# Altium PCB stabilizer_current_sense.PcbDoc (part 2 of 3)
Units mm, origin at the board's own origin, x right, y up, seen from the top; angles counter-clockwise.
Board outline 113.55 x 100 mm, 4 copper layers (Top, L2, L3, Bottom Layer), stack 1.579 mm thick; 206 components, 77 nets, 530 pads, 258 vias.
Unrouted connection lines stored in the file: 53.
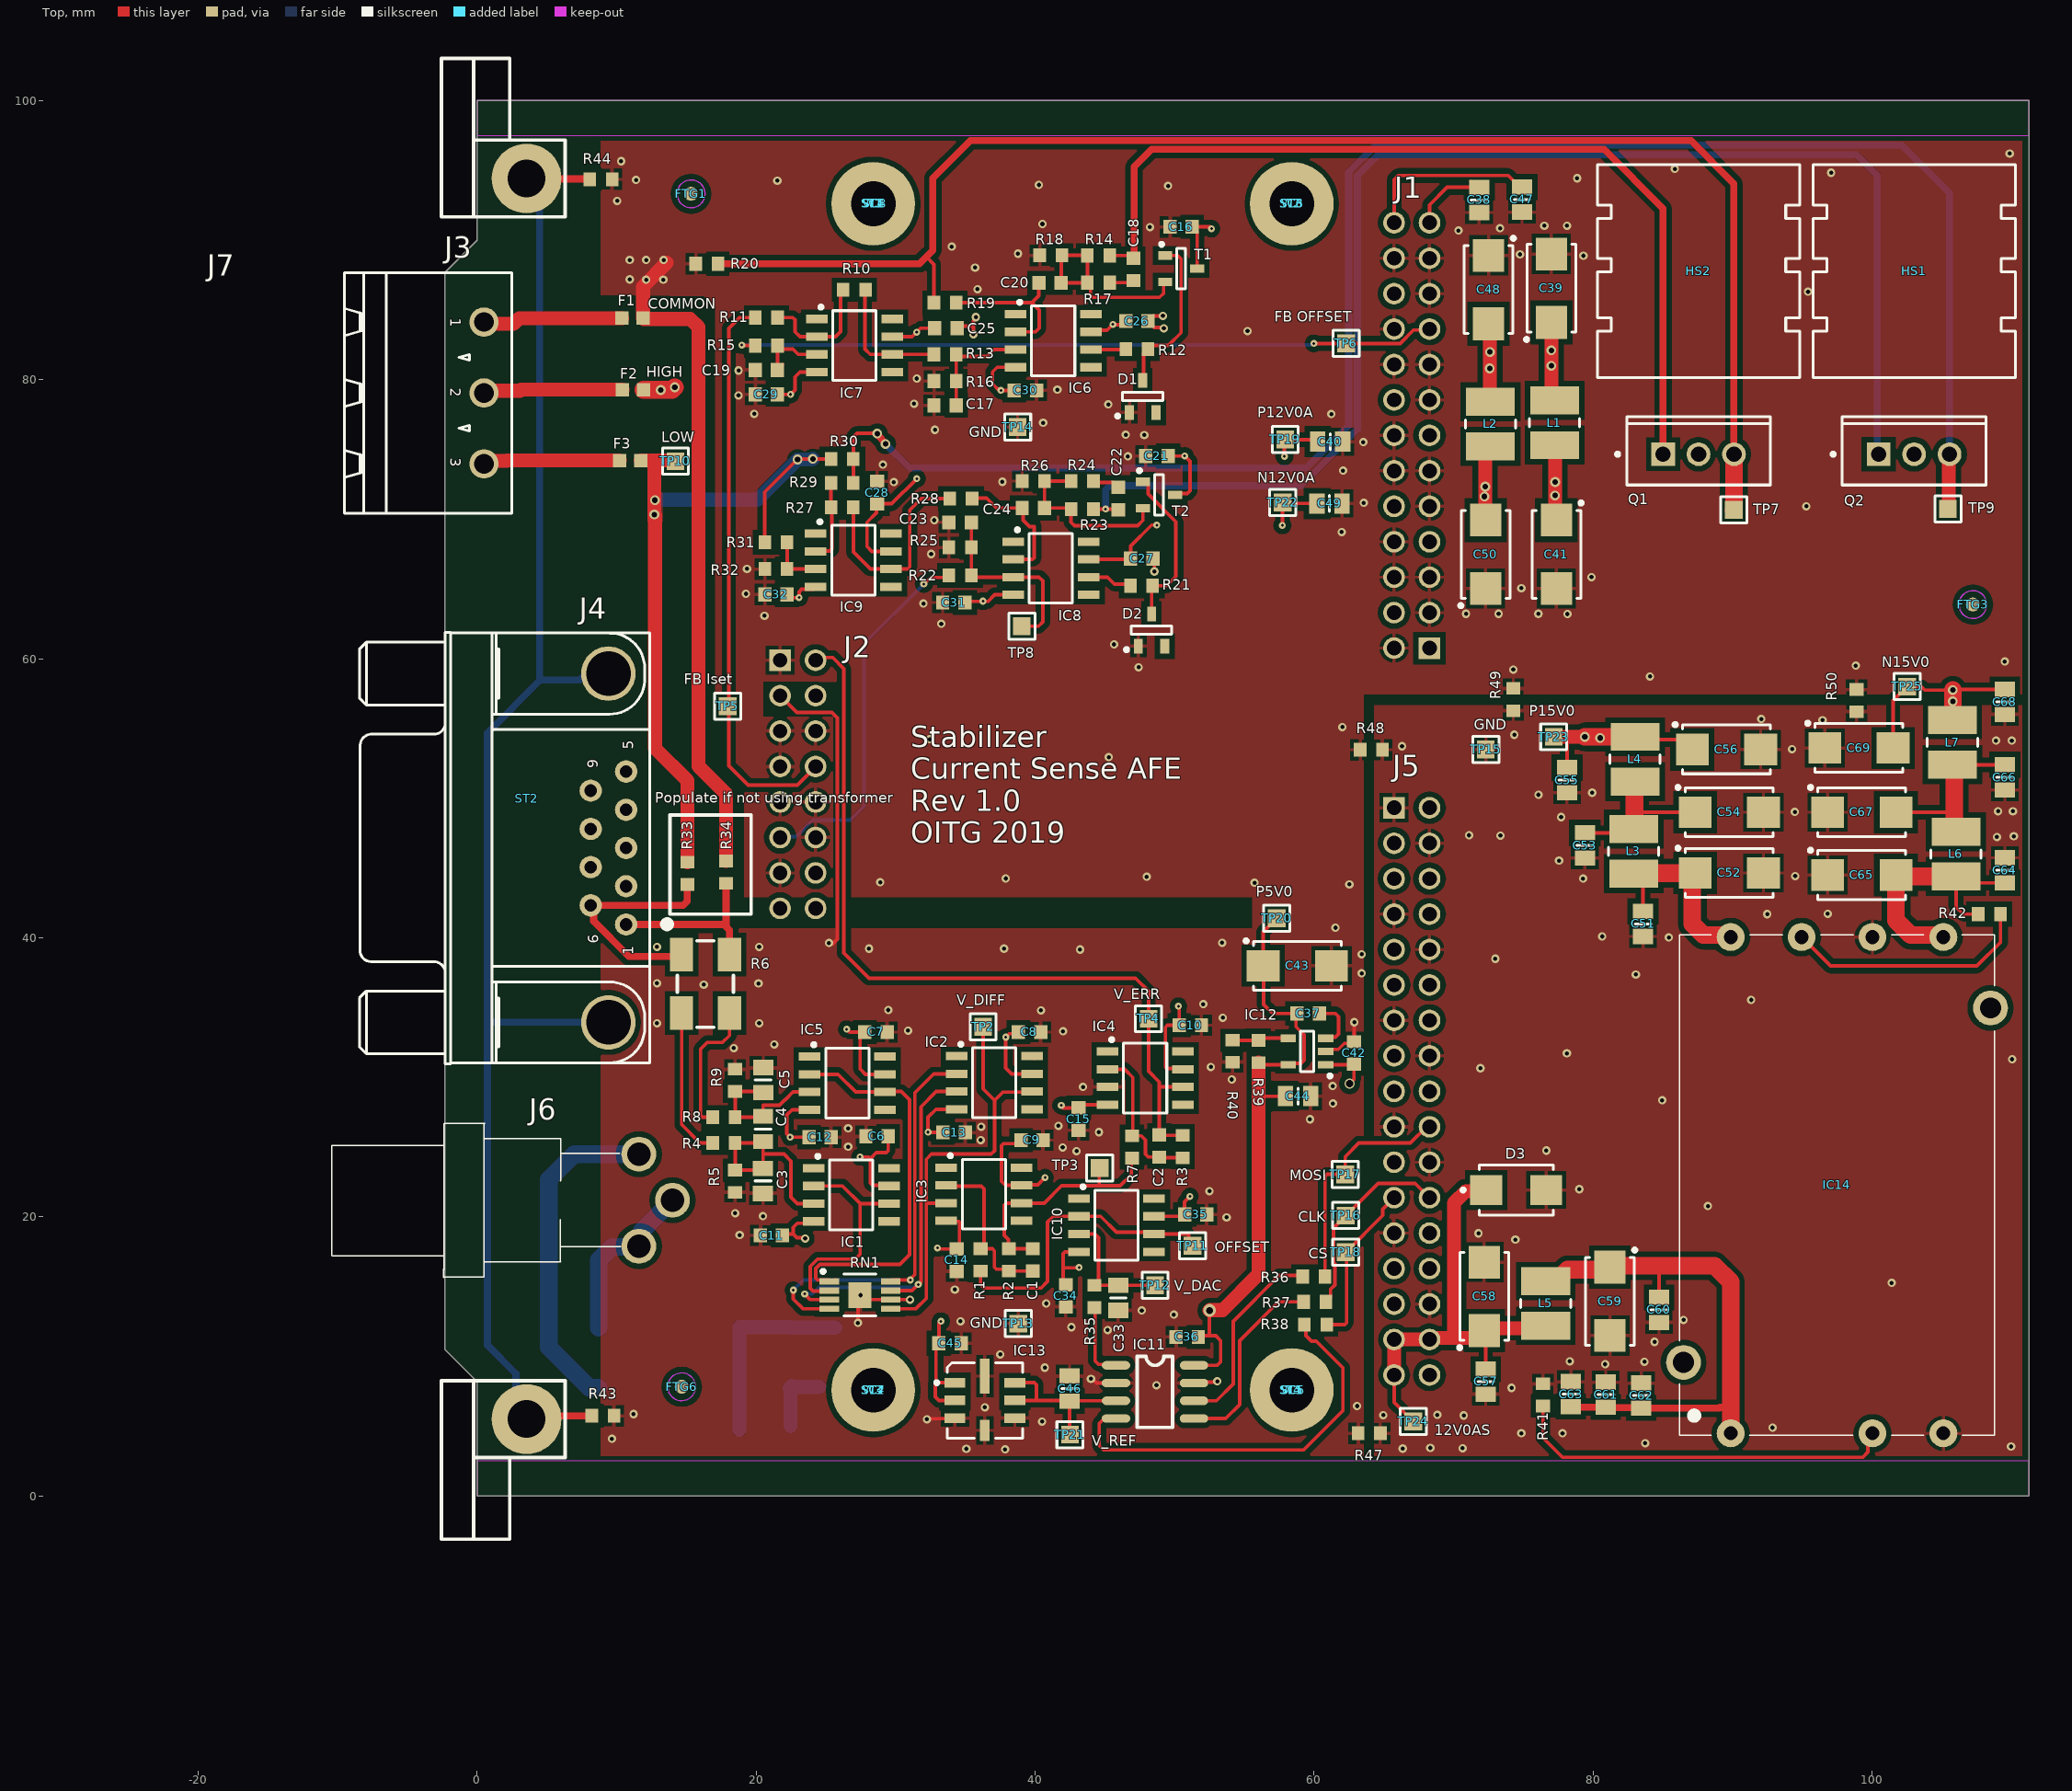
[diagram p0: Top view]

## Part data (continued)
R39: library part R0603_6K2_1%_0.1W_100PPM, "Resistor - 1%", Case=0603, Manufacturer=GENERIC, Manufacturer1 ComponentHeight=0.55mm, Manufacturer1 Example="NIC COMPONENT", Manufacturer1 Part Number=NRC06F6201TRF, Power=0.1W, Tolerance=±1%, Author="CERN DEM JLC", Component Type=Standard, CreateDate=03/12/2007, HelpURL=\\cern.ch\dfs\Applications\Altium\Datasheets\R0603_NIC_NRC.pdf, LatestRevisionDate=13/03/2008, Manufacturer Part Number=R0603_6K2_1%_0.1W_100PPM, Mounted=Yes, Part Description="General Purpose Thick Film Chip Resistor", Part Number=R0603_6K2_1%_0.1W_100PPM, Pin Count=2, PressFit=No, Sense=No, SMD=Yes, Socket=No, Status=Preferred, TC=±100ppm/°C
R40: library part R0603_2K_1%_0.1W_100PPM, "Resistor - 1%", Case=0603, Manufacturer=GENERIC, Manufacturer1 ComponentHeight=0.55mm, Manufacturer1 Example="NIC COMPONENT", Manufacturer1 Part Number=NRC06F2001TRF, Power=0.1W, Tolerance=±1%, Author="CERN DEM JLC", Component Type=Standard, CreateDate=03/12/2007, HelpURL=\\cern.ch\dfs\Applications\Altium\Datasheets\R0603_NIC_NRC.pdf, LatestRevisionDate=13/03/2008, Manufacturer Part Number=R0603_2K_1%_0.1W_100PPM, Mounted=Yes, Part Description="General Purpose Thick Film Chip Resistor", Part Number=R0603_2K_1%_0.1W_100PPM, Pin Count=2, PressFit=No, Sense=No, SMD=Yes, Socket=No, Status=Preferred, TC=±100ppm/°C
RN1: library part RN_1K_1K_LINEAR_LT5400ACMS8E-4#PBF, "DIL8 Resistor Network 4 Isolated Resistor 0.01% + Exposed Pad", Case=MSOP8, Manufacturer="LINEAR TECHNOLOGY", Manufacturer Part Number=LT5400ACMS8E-4#PBF, Power=4x0.8W, Tolerance=0.01%, Author="CERN DEM MR", ComponentHeight=1.1mm, Component Type=Standard, CreateDate=22/02/2016, HelpURL=\\cern.ch\dfs\Applications\Altium\Datasheets\RN_LINEAR_LT5400.pdf, LatestRevisionDate=26/02/2018, Mounted=Yes, Part Description="Quad Matched Resistor Network, Temperature Range  0°C to 70°C, LT5400 Series", Part Number=RN_1K_1K_LINEAR_LT5400ACMS8E-4#PBF, Pin Count=9, PressFit=No, Sense=No, SMD=Yes, Socket=No, TC=±0.2ppm/°C
SC1 SC2 SC3 SC4 SC5 SC6 SC7 SC8: "M3 x 8mm cap head screw", Manufacturer="Accu Limited", Manufacturer Part Number=SSCF-M3-8-12.9-Z
ST1 ST3 ST4 ST5: library part STANDOFF_HARWIN_R30_1001802, "M3.0x18 standoff", Manufacturer=Harwin, Manufacturer Part Number=R30-1001802
ST2: "Schroff 3HP 4U EUROCARD Panel with EMI gaskets kit", Manufacturer=Schroff, Manufacturer Part Number=20848-664
T1 T2: "NPN Transistor", Case=SOT23-3, Manufacturer="NXP SEMICONDUCTORS", Author="CERN DEM JLC", Bonding=No, ComponentHeight=1.1mm, Component Type=Standard, CreateDate=10/03/2011, Device=BC846B, HelpURL=\\cern.ch\dfs\Applications\Altium\Datasheets\BC846B.pdf, LatestRevisionDate=10/03/2011, Manufacturer Part Number=BC846B, Mounted=Yes, PackageDescription="SOT23, 3 pin, Pitch 0.95mm - 1.3mm W X 2.9mm L X 1.1mm H, IPC Medium Density", Part Description="65 V 100mA NPN general-purpose transistors", Part Number=BC846B, Pin Count=3, PressFit=No, Sense=No, SMD=Yes, Socket=No
TP2 TP3 TP4 TP5 TP6 TP7 TP8 TP9 TP10 TP11 TP12 TP13 TP14 TP15 TP16 TP17 TP18 TP19 TP20 TP21 TP22 TP23 TP24 TP25: library part SMD_PAD_1.27X1.27MM, Author="CERN DEM JLC", ComponentHeight=0mm, Component Type="Standard (No BOM)", CreateDate=12/01/2008, Family="Test Point", HelpURL=Undefined, LatestRevisionDate=12/01/2008, Mounted=No, PackageDescription="1.27mm x 1.27mm PCB Copper Area (SMD Test Point)", Part Description="1.27mm x 1.27mm PCB Copper Area (SMD Test Point)", Part Number=SMD_PAD_1.27X1.27MM, Pin Count=1, Sense=No, SMD=Yes, Socket=No, Status=None
W1 W2 W3 W4: "M3 Washer: / ID: 3.2mm / OD: 6mm / Thickness 0.8mm", Manufacturer="Accu Limited", Manufacturer Part Number=HAFZ-M3-A4

## Free pads (board coordinates)
  round 6 hole 3.2: 1(28.4,7.6) 1(28.4,92.6) 1(58.4,7.6) 1(58.4,92.6)

## Via types
v1: diameter 0.6, hole 0.3, Top to Bottom Layer, tented both sides, 204 vias
v2: diameter 0.5, hole 0.2, Top to Bottom Layer, tented both sides, 32 vias
v3: diameter 0.7, hole 0.4, Top to Bottom Layer, tented both sides, 20 vias
v4: diameter 0.75, hole 0.5, Top to Bottom Layer, tented both sides, 1 vias
v5: diameter 0.9, hole 0.5, Top to Bottom Layer, tented both sides, 1 vias

## Nets (pads, with @x,y where several pads share a name; then routed paths per layer and width w, separated by ;. In a path a pad name is that pad's centre, name@x,y a point inside that pad or via, vN(x,y) a via of type N, cw(c..) or ccw(c..) an arc to the next point about the centre after c; other vN are vias at no path point)
ADC0_P: C2.2 IC4.6 J2.2 R3.2 TP4.1 | length 59.8
  Top w0.254: J2.2@24.27,59.89 24.467,60.087 25.501,60.087 26.3,59.288 26.3,38.902 28.102,37.1 47.2,37.1 48.133,36.167 TP4.1@48.133,34.2 48.133,30.435 48.9,29.669 48.9,29.325 ; R3.2@50.581,25.841 48.938,25.841 C2.2@48.9,25.879 48.9,29.325 ; IC4.6@50.591,29.316 48.909,29.316 48.9,29.325
AUX_DAC0: J1.19 R15.1 TP6.1 | length 50.7
  Top w0.254: v2(18.982,82.475) 19.02,82.437 R15.1@19.94,82.437 ; v2(59.984,82.591) 66.156,82.591 67.114,83.549 68.199,83.549 J1.19@68.27,83.62
  Bottom Layer w0.254: v2(18.982,82.475) 59.801,82.475 59.917,82.591 v2(59.984,82.591)